# Altium PCB AudioMoth-v1.3.PcbDoc (part 2 of 4)
Units mil, origin at the board's own origin, x right, y up, seen from the top; angles counter-clockwise.
Board outline 4924.42 x 1891.72 mil, 4 copper layers (Top Layer, Layer 1, Layer 2, Bottom Layer), stack 61.651 mil thick; 157 components, 143 nets, 670 pads, 350 vias.
Unrouted connection lines stored in the file: 32.
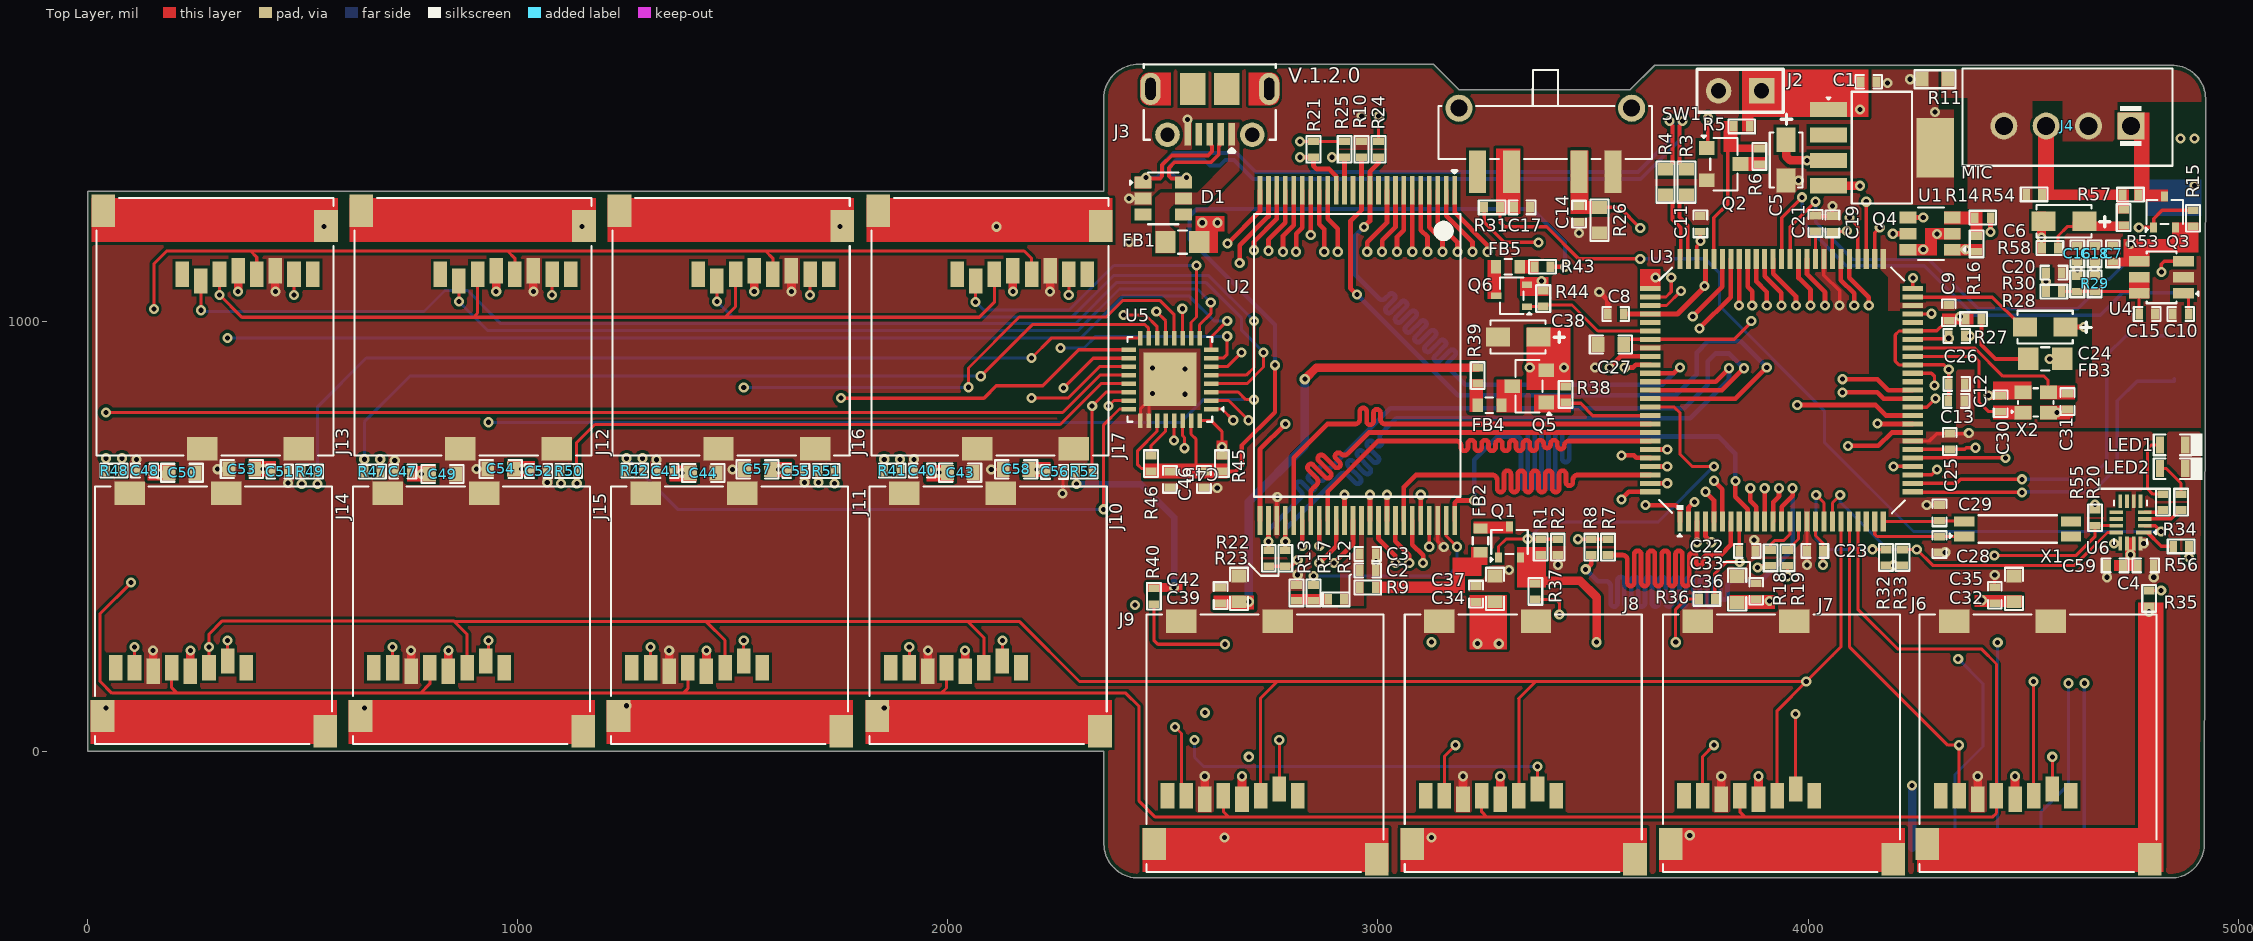
[diagram p0: Top Layer view]

## Part data (continued)
Q4: "MOSFET N/P-CH 20V 3A/2.2A SSOT-6", LCSC Part Number=C154515, Manufacturer="ON Semiconductor / Fairchild", ComponentLink1Description=https://datasheet.ciiva.com/4440/fdc6420c-102817-4440882.pdf?src-supplier=Mouser, ComponentLink1URL=https://datasheet.ciiva.com/4440/fdc6420c-102817-4440882.pdf?src-supplier=Mouser, ComponentLink2Description=https://datasheet.ciiva.com/6039/265059-6039814.pdf?src-supplier=Farnell, ComponentLink2URL=https://datasheet.ciiva.com/6039/265059-6039814.pdf?src-supplier=Farnell, ComponentLink3Description=https://datasheet.ciiva.com/6386/fdc6420c-6386714.pdf?src-supplier=Digikey, ComponentLink3URL=https://datasheet.ciiva.com/6386/fdc6420c-6386714.pdf?src-supplier=Digikey, ComponentLink4Description=https://datasheet.ciiva.com/6386/fdc6420c-6386716.pdf?src-supplier=Digikey, ComponentLink4URL=https://datasheet.ciiva.com/6386/fdc6420c-6386716.pdf?src-supplier=Digikey, ComponentLink5Description=https://datasheet.ciiva.com/8115/fdc6420c-8115576.pdf?src-supplier=Avnet, ComponentLink5URL=https://datasheet.ciiva.com/8115/fdc6420c-8115576.pdf?src-supplier=Avnet, ComponentLink6Description=https://datasheet.ciiva.com/7967/265059-7967846.pdf?src-supplier=Element14, ComponentLink6URL=https://datasheet.ciiva.com/7967/265059-7967846.pdf?src-supplier=Element14, ComponentLink7Description=https://datasheet.ciiva.com/22681/265059-22681865.pdf?src-supplier=Element14, ComponentLink7URL=https://datasheet.ciiva.com/22681/265059-22681865.pdf?src-supplier=Element14, ComponentLink8Description=https://datasheet.ciiva.com/17288/fdc6420c-17288069.pdf?src-supplier=Future+Electronics, ComponentLink8URL=https://datasheet.ciiva.com/17288/fdc6420c-17288069.pdf?src-supplier=Future+Electronics, Item Type=MOSFETs, Manufacturer Part Number=FDC6420C, Pricing="3000=0.21, 6000=0.205, 9000=0.2, 12000=0.2, 15000=0.195 (USD)", RoHS=Yes, Stock=42000, Supplier="Future Electronics"
Q5: "P-Channel MOSFETs ROHS", LCSC Part Number=C7202986, Manufacturer="TECH PUBLIC", Package=SOT-23, ComponentLink1Description=LCSC, ComponentLink1URL=https://www.lcsc.com/product-detail/MOSFETs_TECH-PUBLIC-DMG3415U_C7202986.html, Item Type=MOSFET, Manufacturer Part Number=DMG3415U
R1 R2 R10 R15 R17 R21 R22 R23 R24 R25 R31 R35 R36 R37 R38 R40 R41 R42 R43 R45 R46 R47 R48 R49 R50 R51 R52 R55 R56: library part RC0402FR-0710KL, "RES 10K OHM 1% 1/16W 0402", Case Code (Imperial)=0402, Case Code (Metric)=1005, LCSC Part Number=C60490, Manufacturer=Yageo, Max Operating Temperature=155°C, Max Power Dissipation=63mW, Min Operating Temperature=-55°C, Power Rating=62.5mW, Resistance=10kR, Resistance Tolerance=1%, Resistor Type="Thick Film", Supplier Part Number 1=603-RC0402FR-0710KL, Temperature Coefficient=100ppm/°C, Voltage Rating=50V, Case/Package=0402, Category="Chip SMD Resistors", ComponentLink1Description=https://datasheet.ciiva.com/7660/38568-7660787.pdf?src-supplier=Element14, ComponentLink1URL=https://datasheet.ciiva.com/7660/38568-7660787.pdf?src-supplier=Element14, ComponentLink2Description=https://datasheet.ciiva.com/7849/1686128-7849814.pdf?src-supplier=Element14, ComponentLink2URL=https://datasheet.ciiva.com/7849/1686128-7849814.pdf?src-supplier=Element14, ComponentLink3Description=https://datasheet.ciiva.com/7983/1018594-7983486.pdf?src-supplier=Element14, ComponentLink3URL=https://datasheet.ciiva.com/7983/1018594-7983486.pdf?src-supplier=Element14, ComponentLink4Description=https://datasheet.ciiva.com/22747/1018594-22747512.pdf?src-supplier=Element14, ComponentLink4URL=https://datasheet.ciiva.com/22747/1018594-22747512.pdf?src-supplier=Element14, ComponentLink5Description=https://datasheet.ciiva.com/12667/pyu-rc0402-51-rohs-l-6-r-12667067.pdf?src-supplier=Mouser, ComponentLink5URL=https://datasheet.ciiva.com/12667/pyu-rc0402-51-rohs-l-6-r-12667067.pdf?src-supplier=Mouser, ComponentLink6Description=https://datasheet.ciiva.com/7849/1784430-7849813.pdf?src-supplier=Element14, ComponentLink6URL=https://datasheet.ciiva.com/7849/1784430-7849813.pdf?src-supplier=Element14, ComponentLink7Description=https://datasheet.ciiva.com/7849/1784430-7849815.pdf?src-supplier=Element14, ComponentLink7URL=https://datasheet.ciiva.com/7849/1784430-7849815.pdf?src-supplier=Element14, Construction=Rectangular, Depth=0.5mm, Features="Moisture Resistant", Height=0.32mm, Item Type=Resistor, Lead Free="Lead Free", Lead Pitch=0.2mm, Length=1mm, Manufacturer Part Number=RC0402FR-0710KL, Military Standard=Not, Number of Pins=2, Number of Terminations=2, Packaging="Tape and Reel", Pricing 1="1=0.10000, 10=0.01400, 50=0.01400, 100=0.00500, 1000=0.00300, 10000=0.00200 (USD)", REACH SVHC="No SVHC", RoHS=Yes, RoHS Compliant=Yes, Series=RC, Stock 1=18648329, Supplier 1=Mouser, Termination=SMD/SMT, Tolerance=1%, Voltage Rating (DC)=50V, Width=0.5mm, Working Voltage=50V
R3 R4: library part RC0603FR-0715RL, "RES 15 OHM 1% 1/10W 0603", Current Rating=50mA, LCSC Part Number=C128059, Manufacturer=Yageo, Supplier Part Number=6308514, Voltage Rating (AC)=50V, Category="Chip SMD Resistors", ComponentLink1Description=https://datasheet.ciiva.com/5989/1686128-5989704.pdf?src-supplier=Farnell, ComponentLink1URL=https://datasheet.ciiva.com/5989/1686128-5989704.pdf?src-supplier=Farnell, ComponentLink2Description=https://datasheet.ciiva.com/8890/pyu-rc0603-51-rohs-l-4-8890742.pdf?src-supplier=Avnet, ComponentLink2URL=https://datasheet.ciiva.com/8890/pyu-rc0603-51-rohs-l-4-8890742.pdf?src-supplier=Avnet, ComponentLink3Description=https://datasheet.ciiva.com/12557/rc0603-272842-12557839.pdf?src-supplier=Mouser, ComponentLink3URL=https://datasheet.ciiva.com/12557/rc0603-272842-12557839.pdf?src-supplier=Mouser, ComponentLink4Description=https://datasheet.ciiva.com/2454/pyu-r-int-thick-7-2454840.pdf?src-supplier=Digikey, ComponentLink4URL=https://datasheet.ciiva.com/2454/pyu-r-int-thick-7-2454840.pdf?src-supplier=Digikey, ComponentLink5Description=https://datasheet.ciiva.com/2454/pyu-r-int-thick-7-2454841.pdf?src-supplier=Digikey, ComponentLink5URL=https://datasheet.ciiva.com/2454/pyu-r-int-thick-7-2454841.pdf?src-supplier=Digikey, ComponentLink6Description=https://datasheet.ciiva.com/2454/pyu-r-int-thick-7-2454842.pdf?src-supplier=Digikey, ComponentLink6URL=https://datasheet.ciiva.com/2454/pyu-r-int-thick-7-2454842.pdf?src-supplier=Digikey, ComponentLink7Description=https://datasheet.ciiva.com/7746/443971-7746262.pdf?src-supplier=Element14, ComponentLink7URL=https://datasheet.ciiva.com/7746/443971-7746262.pdf?src-supplier=Element14, ComponentLink8Description=https://datasheet.ciiva.com/7746/443971-7746263.pdf?src-supplier=Element14, ComponentLink8URL=https://datasheet.ciiva.com/7746/443971-7746263.pdf?src-supplier=Element14, Contact Material=157ConductorMaterial, Item Type=Resistor, Lead Free=5697LeadFree, Manufacturer Part Number=RC0603FR-0715RL, Pricing="5000=0.0011, 75000=0.001, 200000=0.001, 500000=0.001, 1250000=0.0009 (USD)", RoHS=Yes, Stock=5830000, Supplier="Future Electronics", Weight=250mg
R5 R6: library part RC0402FR-0749K9L, "RES 49.9K OHM 1% 1/16W 0402", Case Code (Imperial)=0402, Case Code (Metric)=1005, LCSC Part Number=C137969, Manufacturer=Yageo, Max Operating Temperature=155°C, Max Power Dissipation=63mW, Min Operating Temperature=-55°C, Power Rating=62.5mW, Supplier Part Number=311-49.9KLRCT-ND, Temperature Coefficient=100ppm/°C, Tolerance=1%, Voltage Rating=50V, Case/Package=0402, Category="Chip SMD Resistors", ComponentLink1Description=https://datasheet.ciiva.com/17071/pyu-rc0402-51-rohs-l-6-r-17071066.pdf?src-supplier=Future+Electronics, ComponentLink1URL=https://datasheet.ciiva.com/17071/pyu-rc0402-51-rohs-l-6-r-17071066.pdf?src-supplier=Future+Electronics, Construction=Rectangular, Depth=0.5mm, Features="Moisture Resistant", Item Type=Resistor, Lead Free="Lead Free", Length=1mm, Manufacturer Part Number=RC0402FR-0749K9L, Military Standard=Not, Number of Terminations=2, Packaging="Tape and Reel", Pricing="1=0.1, 10=0.015, 50=0.0088, 100=0.0073, 500=0.00488, 1000=0.00417, 5000=0.00297 (USD)", RoHS=Yes, RoHS Compliant=Yes, Series=RC, Stock=5084418, Supplier=Digikey, Termination=SMD/SMT, Voltage Rating (DC)=50V
R7 R12: library part RC0402FR-070RL, "RES 0 OHM JUMPER 1/16W 0402", Case Code (Imperial)=0402, Case Code (Metric)=1005, LCSC Part Number=C106231, Manufacturer=Yageo, Max Operating Temperature=155°C, Max Power Dissipation=63mW, Min Operating Temperature=-55°C, Power Rating=62.5mW, Resistance=0R, Resistor Type="Thick Film", Supplier Part Number 1=603-RC0402FR-070RL, Temperature Coefficient=200ppm/°C, Tolerance=1%, Voltage Rating=50V, Case/Package=0402, ComponentLink1Description=https://datasheet.ciiva.com/8896/pyu-rc0402-51-rohs-l-6-8896149.pdf?src-supplier=Avnet, ComponentLink1URL=https://datasheet.ciiva.com/8896/pyu-rc0402-51-rohs-l-6-8896149.pdf?src-supplier=Avnet, ComponentLink2Description=https://datasheet.ciiva.com/16790/pyu-rc0402-51-rohs-l-6-r-16790444.pdf?src-supplier=Future+Electronics, ComponentLink2URL=https://datasheet.ciiva.com/16790/pyu-rc0402-51-rohs-l-6-r-16790444.pdf?src-supplier=Future+Electronics, Contact Plating=Tin,Matte, Features="Moisture Resistant", Height=0.35mm, Item Type=Resistors, Lead Free="Lead Free", Length=1mm, Manufacturer Part Number=RC0402FR-070RL, Mount="Surface Mount", Number of Terminations=2, Packaging="Tape and Reel", Pricing 1="1=0.10000, 10=0.01400, 50=0.01400, 100=0.00600, 1000=0.00300, 5000=0.00200, 10000=0.00100 (USD)", Radiation Hardening=No, RoHS=Yes, RoHS Compliant=Yes, Series=RC, Size Code=0402, Stock 1=8556842, Supplier 1=Mouser, Termination=SMD/SMT, Width=0.5mm
R8 R13 R18 R19 R53: library part RC0402FR-070RL, "RES 0 OHM JUMPER 1/16W 0402", Case Code (Imperial)=0402, Case Code (Metric)=1005, LCSC Part Number=C106231, Manufacturer=Yageo, Max Operating Temperature=155°C, Max Power Dissipation=63mW, Min Operating Temperature=-55°C, Power Rating=62.5mW, Resistor Type="Thick Film", Supplier Part Number 1=603-RC0402FR-070RL, Temperature Coefficient=200ppm/°C, Tolerance=1%, Voltage Rating=50V, Case/Package=0402, ComponentLink1Description=https://datasheet.ciiva.com/8896/pyu-rc0402-51-rohs-l-6-8896149.pdf?src-supplier=Avnet, ComponentLink1URL=https://datasheet.ciiva.com/8896/pyu-rc0402-51-rohs-l-6-8896149.pdf?src-supplier=Avnet, ComponentLink2Description=https://datasheet.ciiva.com/16790/pyu-rc0402-51-rohs-l-6-r-16790444.pdf?src-supplier=Future+Electronics, ComponentLink2URL=https://datasheet.ciiva.com/16790/pyu-rc0402-51-rohs-l-6-r-16790444.pdf?src-supplier=Future+Electronics, Contact Plating=Tin,Matte, Features="Moisture Resistant", Height=0.35mm, Item Type=Resistors, Lead Free="Lead Free", Length=1mm, Manufacturer Part Number=RC0402FR-070RL, Mount="Surface Mount", Number of Terminations=2, Packaging="Tape and Reel", Pricing 1="1=0.10000, 10=0.01400, 50=0.01400, 100=0.00600, 1000=0.00300, 5000=0.00200, 10000=0.00100 (USD)", Radiation Hardening=No, Resistance=0R, RoHS=Yes, RoHS Compliant=Yes, Series=RC, Size Code=0402, Stock 1=8556842, Supplier 1=Mouser, Termination=SMD/SMT, Width=0.5mm
R9 R27 R28 R29 R30 R39 R44: library part RC0402FR-071RL, "RES 1 OHM 1% 1/16W 0402", Case Code (Imperial)=0402, Case Code (Metric)=1005, LCSC Part Number=C185446, Manufacturer=Yageo, Max Operating Temperature=155°C, Max Power Dissipation=63mW, Min Operating Temperature=-55°C, Power Rating=62.5mW, Resistance Tolerance=1%, Resistor Type="Thick Film", Supplier Part Number 1=603-RC0402FR-071RL, Temperature Coefficient=200ppm/°C, Voltage Rating=50V, Case/Package=0402, Category="Chip SMD Resistors", ComponentLink1Description=https://datasheet.ciiva.com/11808/0900766b80c66297-11808794.pdf?src-supplier=RSComponents, ComponentLink1URL=https://datasheet.ciiva.com/11808/0900766b80c66297-11808794.pdf?src-supplier=RSComponents, ComponentLink2Description=https://datasheet.ciiva.com/7849/1018594-7849895.pdf?src-supplier=Element14, ComponentLink2URL=https://datasheet.ciiva.com/7849/1018594-7849895.pdf?src-supplier=Element14, ComponentLink3Description=https://datasheet.ciiva.com/7849/1018594-7849894.pdf?src-supplier=Element14, ComponentLink3URL=https://datasheet.ciiva.com/7849/1018594-7849894.pdf?src-supplier=Element14, ComponentLink4Description=https://datasheet.ciiva.com/46394/1018594-46394952.pdf?src-supplier=Element14, ComponentLink4URL=https://datasheet.ciiva.com/46394/1018594-46394952.pdf?src-supplier=Element14, ComponentLink5Description=https://datasheet.ciiva.com/12667/pyu-rc0402-51-rohs-l-6-r-12667915.pdf?src-supplier=Mouser, ComponentLink5URL=https://datasheet.ciiva.com/12667/pyu-rc0402-51-rohs-l-6-r-12667915.pdf?src-supplier=Mouser, ComponentLink6Description=https://datasheet.ciiva.com/16740/pyu-rc0402-51-rohs-l-6-r-16740903.pdf?src-supplier=Future+Electronics, ComponentLink6URL=https://datasheet.ciiva.com/16740/pyu-rc0402-51-rohs-l-6-r-16740903.pdf?src-supplier=Future+Electronics, Construction=Rectangular, Depth=0.5mm, Features="Moisture Resistant", Height=0.32mm, Item Type=Resistor, Lead Free="Lead Free", Length=1mm, Manufacturer Part Number=RC0402FR-071RL, Military Standard=Not, Number of Terminations=2, Packaging="Tape and Reel", Pricing 1="1=0.10000, 10=0.02200, 50=0.02200, 100=0.00900, 1000=0.00400, 10000=0.00200 (USD)", REACH SVHC="No SVHC", Resistance=1R, RoHS=Yes, RoHS Compliant=Yes, Series=RC, Stock 1=239284, Supplier 1=Mouser, Technology="THICK FILM", Termination=SMD/SMT, Tolerance=1%, Voltage Rating (DC)=50V, Working Voltage=50V
R11: library part RC0603JR-070RL, "RES 0 OHM JUMPER 1/10W 0603", Case Code (Imperial)=0603, Case Code (Metric)=1608, LCSC Part Number=C95177, Manufacturer=Yageo, Max Operating Temperature=155°C, Max Power Dissipation=100mW, Min Operating Temperature=-55°C, Package Quantity=5000, Resistance=0mR, Resistance Tolerance=5%, Resistor Type="Thick Film", Supplier Part Number 1=311-0.0GRCT-ND, Temperature Coefficient=200ppm/°C, Tolerance=1%, Voltage Rating=50V, Case/Package=0603, Category="Chip SMD Resistors", Construction=Rectangular, Contact Plating=Tin,Matte, Depth=0.8mm, Features="Moisture Resistant", Height=0.45mm, Item Type=Resistor, Lead Free="Lead Free", Length=1.6mm, Manufacturer Part Number=RC0603JR-070RL, Military Standard=Not, Number of Pins=2, Number of Terminations=2, Packaging="Tape and Reel", Power Rating=100mW, Pricing 1="1=0.10000, 10=0.01700, 25=0.01240, 50=0.00960, 100=0.00700, 250=0.00536, 500=0.00430, 1000=0.00316 (USD)", Radiation Hardening=No, Reach SVHC Compliant="No SVHC", RoHS=Yes, RoHS Compliant=Yes, Series=RC, Size Code=0603, Stock 1=18081776, Supplier 1=Digi-Key, Technology="THICK FILM", Termination=SMD/SMT, Voltage Rating (DC)=50V, Width=0.8mm
R14: library part RC0402FR-076K8L, "RES 6.8K OHM 1% 1/16W 0402", Case Code (Imperial)=0402, Case Code (Metric)=1005, LCSC Part Number=C93940, Manufacturer=Yageo, Max Operating Temperature=155°C, Max Power Dissipation=63mW, Min Operating Temperature=-55°C, Package Quantity=1, Resistance=6.8kR, Resistance Tolerance=1%, Resistor Type="Thick Film", Temperature Coefficient=100ppm/°C, Voltage Rating=50V, Case/Package=0402, Category="Chip SMD Resistors", ComponentLink1Description=https://datasheet.ciiva.com/11819/0900766b80c66297-11819535.pdf?src-supplier=RSComponents, ComponentLink1URL=https://datasheet.ciiva.com/11819/0900766b80c66297-11819535.pdf?src-supplier=RSComponents, ComponentLink2Description=https://datasheet.ciiva.com/2453/pyu-r-int-thick-7-2453500.pdf?src-supplier=Digi-Key, ComponentLink2URL=https://datasheet.ciiva.com/2453/pyu-r-int-thick-7-2453500.pdf?src-supplier=Digi-Key, ComponentLink3Description=https://datasheet.ciiva.com/2453/pyu-r-int-thick-7-2453501.pdf?src-supplier=Digi-Key, ComponentLink3URL=https://datasheet.ciiva.com/2453/pyu-r-int-thick-7-2453501.pdf?src-supplier=Digi-Key, ComponentLink4Description=https://datasheet.ciiva.com/2453/pyu-r-int-thick-7-2453499.pdf?src-supplier=Digi-Key, ComponentLink4URL=https://datasheet.ciiva.com/2453/pyu-r-int-thick-7-2453499.pdf?src-supplier=Digi-Key, ComponentLink5Description=https://datasheet.ciiva.com/12668/pyu-rc0402-51-rohs-l-6-r-12668201.pdf?src-supplier=Mouser, ComponentLink5URL=https://datasheet.ciiva.com/12668/pyu-rc0402-51-rohs-l-6-r-12668201.pdf?src-supplier=Mouser, ComponentLink6Description=https://datasheet.ciiva.com/7850/1018594-7850078.pdf?src-supplier=Element14, ComponentLink6URL=https://datasheet.ciiva.com/7850/1018594-7850078.pdf?src-supplier=Element14, ComponentLink7Description=https://datasheet.ciiva.com/7850/1018594-7850079.pdf?src-supplier=Element14, ComponentLink7URL=https://datasheet.ciiva.com/7850/1018594-7850079.pdf?src-supplier=Element14, ComponentLink8Description=https://datasheet.ciiva.com/16741/pyu-rc0402-51-rohs-l-6-r-16741018.pdf?src-supplier=Future+Electronics, ComponentLink8URL=https://datasheet.ciiva.com/16741/pyu-rc0402-51-rohs-l-6-r-16741018.pdf?src-supplier=Future+Electronics, Construction=Rectangular, Depth=0.5mm, Features="Moisture Resistant", Height=0.016inch, Item Type=Resistor, Lead Free="Lead Free", Length=0.039inch, Manufacturer Part Number=RC0402FR-076K8L, Military Standard=Not, Number of Pins=2, Number of Terminations=2, Packaging="Tape and Reel", Power Rating=63mW, Pricing 1="10000=0.00085 (USD)", Reach SVHC Compliant=Yes, RoHS=Yes, RoHS Compliant=Yes, Series=RC, Size Code=0402, Stock 1=290000, Supplier 1=Avnet, Supplier Part Number 1=RC0402FR-076K8L, Technology="THICK FILM", Termination=SMD/SMT, Tolerance=1%, Voltage Rating (DC)=50V, Width=0.02inch
R16 R32 R33: library part RC0402FR-074K7L, "RES 4.7K OHM 1% 1/16W 0402", Case Code (Imperial)=0402, Case Code (Metric)=1005, LCSC Part Number=C105871, Manufacturer=Yageo, Max Operating Temperature=155°C, Max Power Dissipation=63mW, Min Operating Temperature=-55°C, Power Rating=62.5mW, Resistance=4.7kR, Resistance Tolerance=1%, Resistor Type="Thick Film", Temperature Coefficient=100ppm/°C, Voltage Rating=50V, Case/Package=0402, Category="Chip SMD Resistors", ComponentLink1Description=https://datasheet.ciiva.com/22661/1686128-22661342.pdf?src-supplier=Element14, ComponentLink1URL=https://datasheet.ciiva.com/22661/1686128-22661342.pdf?src-supplier=Element14, ComponentLink2Description=https://datasheet.ciiva.com/7850/1018594-7850022.pdf?src-supplier=Element14, ComponentLink2URL=https://datasheet.ciiva.com/7850/1018594-7850022.pdf?src-supplier=Element14, ComponentLink3Description=https://datasheet.ciiva.com/7850/1018594-7850023.pdf?src-supplier=Element14, ComponentLink3URL=https://datasheet.ciiva.com/7850/1018594-7850023.pdf?src-supplier=Element14, ComponentLink4Description=https://datasheet.ciiva.com/15215/getdatasheetpartid-328119-15215035.pdf?src-supplier=Verical, ComponentLink4URL=https://datasheet.ciiva.com/15215/getdatasheetpartid-328119-15215035.pdf?src-supplier=Verical, Construction=Rectangular, Depth=0.5mm, Features="Moisture Resistant", Height=0.32mm, Height - Seated (Max)=0.016inch, Item Type=Resistor, Lead Free="Lead Free", Length=1mm, Manufacturer Part Number=RC0402FR-074K7L, Military Standard=Not, Number of Pins=2, Number of Terminations=2, Packaging="Tape and Reel", Pricing 1="10000=0.00085 (USD)", Reach SVHC Compliant=Yes, RoHS=Yes, RoHS Compliant=Yes, Series=RC, Size Code=0402, Stock 1=2420000, Supplier 1=Avnet, Supplier Part Number 1=RC0402FR-074K7L, Termination=SMD/SMT, Tolerance=1%, Voltage Rating (DC)=50V, Width=0.5mm
R20: library part RC0402FR-07240RL, "RES 240 OHM 1% 1/16W 0402", Case Code (Imperial)=0402, Case Code (Metric)=1005, LCSC Part Number=C114755, Manufacturer=Yageo, Max Operating Temperature=155°C, Max Power Dissipation=63mW, Min Operating Temperature=-55°C, Package Quantity=1, Resistance Tolerance=1%, Resistor Type="Thick Film", Supplier Part Number 1=603-RC0402FR-07240RL, Temperature Coefficient=100ppm/°C, Voltage Rating=50V, Case/Package=0402, ComponentLink1Description=https://datasheet.ciiva.com/7849/1018594-7849915.pdf?src-supplier=Element14, ComponentLink1URL=https://datasheet.ciiva.com/7849/1018594-7849915.pdf?src-supplier=Element14, ComponentLink2Description=https://datasheet.ciiva.com/7849/1018594-7849916.pdf?src-supplier=Element14, ComponentLink2URL=https://datasheet.ciiva.com/7849/1018594-7849916.pdf?src-supplier=Element14, ComponentLink3Description=https://datasheet.ciiva.com/2519/pyu-r-int-thick-7-2519157.pdf?src-supplier=Digi-Key, ComponentLink3URL=https://datasheet.ciiva.com/2519/pyu-r-int-thick-7-2519157.pdf?src-supplier=Digi-Key, ComponentLink4Description=https://datasheet.ciiva.com/2519/pyu-r-int-thick-7-2519158.pdf?src-supplier=Digi-Key, ComponentLink4URL=https://datasheet.ciiva.com/2519/pyu-r-int-thick-7-2519158.pdf?src-supplier=Digi-Key, ComponentLink5Description=https://datasheet.ciiva.com/2519/pyu-r-int-thick-7-2519156.pdf?src-supplier=Digi-Key, ComponentLink5URL=https://datasheet.ciiva.com/2519/pyu-r-int-thick-7-2519156.pdf?src-supplier=Digi-Key, ComponentLink6Description=https://datasheet.ciiva.com/12669/pyu-rc0402-51-rohs-l-6-r-12669689.pdf?src-supplier=Mouser, ComponentLink6URL=https://datasheet.ciiva.com/12669/pyu-rc0402-51-rohs-l-6-r-12669689.pdf?src-supplier=Mouser, ComponentLink7Description=https://datasheet.ciiva.com/17419/pyu-rc0402-51-rohs-l-6-r-17419482.pdf?src-supplier=Future+Electronics, ComponentLink7URL=https://datasheet.ciiva.com/17419/pyu-rc0402-51-rohs-l-6-r-17419482.pdf?src-supplier=Future+Electronics, Construction=Rectangular, Depth=0.5mm, Features="Moisture Resistant", Height=0.016inch, Item Type=Resistors, Lead Free="Lead Free", Length=1mm, Manufacturer Part Number=RC0402FR-07240RL, Military Standard=Not, Number of Terminations=2, Packaging="Tape and Reel", Power Rating=63mW, Pricing 1="1=0.10000, 10=0.01200, 50=0.01200, 100=0.00500, 1000=0.00300, 10000=0.00100 (USD)", REACH SVHC=Unknown, Resistance=240R, RoHS=Yes, RoHS Compliant=Yes, Series=RC, Size Code=0402, Stock 1=1903202, Supplier 1=Mouser, Termination=SMD/SMT, Tolerance=1%, Voltage Rating (DC)=50V, Width=0.02inch
R26: library part RC0603JR-07270KL, "RES 270K OHM 5% 1/10W 0603", Case Code (Imperial)=0603, Case Code (Metric)=1608, LCSC Part Number=C137642, Manufacturer=Yageo, Max Operating Temperature=155°C, Max Power Dissipation=100mW, Min Operating Temperature=-55°C, Resistance=270kR, Resistance Tolerance=5%, Resistor Type="Thick Film", Temperature Coefficient=100ppm/°C, Voltage Rating=50V, Working Voltage=75V, Case/Package=0603, Category="Chip SMD Resistors", ComponentLink1Description=https://datasheet.ciiva.com/22643/1868787-22643417.pdf?src-supplier=Element14, ComponentLink1URL=https://datasheet.ciiva.com/22643/1868787-22643417.pdf?src-supplier=Element14, ComponentLink2Description=https://datasheet.ciiva.com/12558/rc0603-272842-12558662.pdf?src-supplier=Mouser, ComponentLink2URL=https://datasheet.ciiva.com/12558/rc0603-272842-12558662.pdf?src-supplier=Mouser, ComponentLink3Description=https://datasheet.ciiva.com/7746/443971-7746474.pdf?src-supplier=Element14, ComponentLink3URL=https://datasheet.ciiva.com/7746/443971-7746474.pdf?src-supplier=Element14, ComponentLink4Description=https://datasheet.ciiva.com/7746/443971-7746473.pdf?src-supplier=Element14, ComponentLink4URL=https://datasheet.ciiva.com/7746/443971-7746473.pdf?src-supplier=Element14, Construction=Rectangular, Depth=0.8mm, Features="Moisture Resistant", Height=0.45mm, Lead Free="Lead Free", Length=1.6mm, Manufacturer Part Number=RC0603JR-07270KL, Military Standard=Not, Number of Pins=2, Number of Terminations=2, Packaging="Tape and Reel", Power Rating=100mW, Pricing 1="1=0.04100, 10=0.00590, 100=0.00230 (USD)", REACH SVHC="No SVHC", RoHS=Yes, RoHS Compliant=Yes, Series=RC, Stock 1=910, Supplier 1="Arrow Electronics", Supplier Part Number 1=RC0603JR-07270KL, Termination=SMD/SMT, Tolerance=5%, Voltage Rating (DC)=50V, Width=0.8mm
R34: library part RC0402FR-07133RL, "RES 133 OHM 1% 1/16W 0402", Case Code (Imperial)=0402, Case Code (Metric)=1005, LCSC Part Number=C327373, Manufacturer=Yageo, Max Operating Temperature=155°C, Max Power Dissipation=63mW, Min Operating Temperature=-55°C, Power Rating=62.5mW, Resistor Type="Thick Film", Supplier Part Number 1=603-RC0402FR-07133RL, Temperature Coefficient=100ppm/°C, Tolerance=1%, Voltage Rating=50V, Case/Package=0402, Category="Chip SMD Resistors", ComponentLink1Description=https://datasheet.ciiva.com/8887/pyu-rc0402-51-rohs-l-6-8887451.pdf?src-supplier=Avnet, ComponentLink1URL=https://datasheet.ciiva.com/8887/pyu-rc0402-51-rohs-l-6-8887451.pdf?src-supplier=Avnet, Construction=Rectangular, Contact Plating=Tin,Matte, Depth=0.5mm, Features="Moisture Resistant", Height=0.016inch, Lead Free="Lead Free", Length=1mm, Manufacturer Part Number=RC0402FR-07133RL, Military Standard=Not, Number of Terminations=2, Packaging="Tape and Reel", Pricing 1="1=0.10000, 10=0.01200, 50=0.01200, 100=0.00500, 1000=0.00300, 2500=0.00200, 10000=0.00100 (USD)", Resistance=133R, RoHS=Yes, RoHS Compliant=Yes, Series=RC, Size Code=0402, Stock 1=12475, Supplier 1=Mouser, Termination=SMD/SMT, Width=0.02inch
R54 R57 R58: library part RC0402JR-0710ML, "RES SMD 10M Ohm 5% 1/16W 0402", Case Code (Imperial)=0402, Case Code (Metric)=1005, LCSC Part Number=C274900, Manufacturer=Yageo, Max Operating Temperature=155°C, Max Power Dissipation=63mW, Min Operating Temperature=-55°C, Package Quantity=1, Power Rating=62.5mW, Resistance=10MR, Resistance Tolerance=5%, Resistor Type="Thick Film", Supplier Part Number 1=311-10MJRCT-ND, Temperature Coefficient=100ppm/°C, Voltage Rating=50V, Case/Package=0402, Category="Chip SMD Resistors", ComponentLink1Description=https://datasheet.ciiva.com/7983/1018594-7983541.pdf?src-supplier=Element14, ComponentLink1URL=https://datasheet.ciiva.com/7983/1018594-7983541.pdf?src-supplier=Element14, ComponentLink2Description=https://datasheet.ciiva.com/2518/pyu-r-int-thick-7-2518904.pdf?src-supplier=Digi-Key, ComponentLink2URL=https://datasheet.ciiva.com/2518/pyu-r-int-thick-7-2518904.pdf?src-supplier=Digi-Key, ComponentLink3Description=https://datasheet.ciiva.com/2518/pyu-r-int-thick-7-2518905.pdf?src-supplier=Digi-Key, ComponentLink3URL=https://datasheet.ciiva.com/2518/pyu-r-int-thick-7-2518905.pdf?src-supplier=Digi-Key, ComponentLink4Description=https://datasheet.ciiva.com/2518/pyu-r-int-thick-7-2518906.pdf?src-supplier=Digi-Key, ComponentLink4URL=https://datasheet.ciiva.com/2518/pyu-r-int-thick-7-2518906.pdf?src-supplier=Digi-Key, ComponentLink5Description=https://datasheet.ciiva.com/12577/pyu-rc0402-51-rohs-l-6-r-12577774.pdf?src-supplier=Mouser, ComponentLink5URL=https://datasheet.ciiva.com/12577/pyu-rc0402-51-rohs-l-6-r-12577774.pdf?src-supplier=Mouser, Construction=Rectangular, Depth=0.5mm, Features="Moisture Resistant", Height=0.016inch, Lead Free="Lead Free", Length=1mm, Manufacturer Part Number=RC0402JR-0710ML, Military Standard=Not, Number of Pins=2, Number of Terminations=2, Packaging="Tape and Reel", Pricing 1="1=0.10000, 10=0.01300, 100=0.00540, 1000=0.00244, 2500=0.00212, 5000=0.00175 (USD)", REACH SVHC="No SVHC", RoHS=Yes, RoHS Compliant=Yes, Series=RC, Size Code=0402, Stock 1=38636, Supplier 1=Digi-Key, Termination=SMD/SMT, Tolerance=5%, Voltage Rating (DC)=50V, Weight=2.3E-05oz, Width=0.02inch
SW1: "300mA Horizontal attachment triple-pole/single-throw 4V 10,000 times SMD Slide Switches ROHS / Switch Slide SP3T Side Slide 0.3A 4VDC 10000Cycle Gull Wing SMD T/R", Case/Package=SMD/SMT, Contact Current Rating=300mA, Contact Resistance=70mR, LCSC Part Number=C160877, Manufacturer="Alps Electric", Max Operating Temperature=85°C, Max Voltage Rating (DC)=4V, Min Operating Temperature=-10°C, ComponentLink1Description=https://datasheet.ciiva.com/16174/793ssss7-16174698.pdf?src-supplier=Onlinecomponents.com, ComponentLink1URL=https://datasheet.ciiva.com/16174/793ssss7-16174698.pdf?src-supplier=Onlinecomponents.com, Electrical Life=10000Cycles, Item Type="Slide Switches", Manufacturer Part Number=SSSS711403, Mechanical Life=10000Cycles, Mounting Technology="Surface Mount", Orientation="Right Angle", Packaging="Tape and Reel", Pricing="2000=0.72384, 4000=0.7072, 8000=0.69056, 12000=0.67392, 16000=0.65728, 20000=0.64064, 200000=0.63232 (USD)", Radiation Hardening=No, RoHS=Yes, RoHS Compliant=Yes, Stock=16000, Supplier=Avnet, Termination=Solder, Throw Configuration=SP3T, Voltage Rating (AC)=4V
U1: "IC REG LINEAR 3.3V 1A SOT223-5", Case/Package=TO-261-5, Dropout Voltage=650mV, Manufacturer="TI National Semiconductor", Max Operating Temperature=125°C, Max Supply Current=100uA, Max Supply Voltage=10V, Min Operating Temperature=-40°C, Min Output Voltage=3.3V, Output Current=1A, Power Supply Rejection Ratio (PSRR)=55dB, Quiescent Current=55uA, Supplier Part Number=926-LP38692MPX33NOPB, ComponentLink1Description=https://datasheet.ciiva.com/6583/lp38690-6583575.pdf?src-supplier=Digikey, ComponentLink1URL=https://datasheet.ciiva.com/6583/lp38690-6583575.pdf?src-supplier=Digikey, Item Type=IC, Lead Free="Lead Free", Manufacturer Part Number=LP38692MPX-3.3/NOPB, Mounting Technology="Surface Mount", Number of Regulators=1, Output Configuration=Positive, Output Type=Fixed, Output Voltage=3.3V, Packaging="Cut Tape", Pins=5, Pricing="1=1.46, 10=1.12, 50=1.12, 100=0.99, 1000=0.795, 10000=0.736 (USD)", RoHS=Yes, RoHS Compliant=Yes, Series=-, Stock=1537, Supplier=Mouser
U2: "IC SRAM 16MBIT PARALLEL 48TSOP I", Case/Package=TFSOP, Manufacturer=ISSI, Max Operating Temperature=85°C, Min Operating Temperature=-40°C, Supplier Part Number=706-IS62WV102416DBLL-55TLI-TRCT-ND, Access Time=55ns, ComponentLink1Description=http://www.mouser.com/ds/2/198/62-65WV102416DALL-DBLL-319010.pdf?src-supplier=Mouser, ComponentLink1URL=http://www.mouser.com/ds/2/198/62-65WV102416DALL-DBLL-319010.pdf?src-supplier=Mouser, ComponentLink2Description=http://www.issi.com/WW/pdf/62-65WV102416DALL-DBLL.pdf?src-supplier=Avnet, ComponentLink2URL=http://www.issi.com/WW/pdf/62-65WV102416DALL-DBLL.pdf?src-supplier=Avnet, ComponentLink3Description=http://www.issi.com/WW/pdf/62-65WV102416DALL-DBLL.pdf?src-supplier=Digikey, ComponentLink3URL=http://www.issi.com/WW/pdf/62-65WV102416DALL-DBLL.pdf?src-supplier=Digikey, Item Type=IC, Manufacturer Part Number=IS62WV102416DBLL-55TLI-TR, Memory Format=Volatile,SRAM, Memory Size=16Mb, Mounting Technology="Surface Mount", Packaging="Tape and Reel", Pricing="1=11.11, 10=9.865, 25=9.408, 50=9.0762, 100=8.7557, 250=8.34852, 500=8.05256 (USD)", RoHS=Yes, RoHS Compliant=Yes, Series=-, Stock=1390, Supplier=Digikey
U3: "IC MCU 32BIT 256KB FLASH 100LQFP", Manufacturer="Silicon Labs", Supplier Part Number=634-WG380256BQFP100R, Item Type=IC, Manufacturer Part Number=EFM32WG380F256-B-QFP100R, Pricing="1=13.12, 10=12.06, 50=11.56, 100=10.18, 1000=8.31, 10000=8.31 (USD)", Stock=2000, Supplier=Mouser
U4: "IC VREF SERIES 0.08% SOT23-6", Case/Package=942Case, LCSC Part Number=C143531, Manufacturer="Analog Devices", Max Operating Temperature=125°C, Max Output current=10mA, Max Supply Voltage=5.5V, Min Input Voltage=2.7V, Min Operating Temperature=-40°C, Min Output Voltage=2.5V, Operating Supply Current=300uA, Quiescent Current=235uA, Tolerance=0.08%, ComponentLink1Description=https://datasheet.octopart.com/MAX6070BAUT25%2BT-Analog-Devices-datasheet-134530559.pdf?src-supplier=LKR, ComponentLink1URL=https://datasheet.octopart.com/MAX6070BAUT25%2BT-Analog-Devices-datasheet-134530559.pdf?src-supplier=LKR, Item Type=IC, Manufacturer Part Number=MAX6070BAUT25+T, Mounting Technology=8Mount, Number of Channels=1NUMBER, Output Current=10mA, Output Type=6317OutputType, Output Voltage=2.5V, Pins=6NUMBER, Pricing="1=3.56, 10=2.63, 50=2.63, 100=2.19, 1000=1.72, 10000=1.53 (USD)", Radiation Hardening=5898YesNo, Reference Type=6142ReferenceType, RoHS=No, Stock=5392, Supplier=Mouser
U5: "IC XPNDR 400KHZ I2C SMBUS 32UQFN", Case/Package=QFN, Clock Frequency=400kHz, LCSC Part Number=C80692, Manufacturer="Texas Instruments", Max Operating Temperature=85°C, Max Supply Voltage=5.5V, Min Operating Temperature=-40°C, Min Supply Voltage=1.65V, Output Current=25mA, Supplier Part Number=595-TCA6424ARGJR, Category="Interface ICs", ComponentLink1Description=https://datasheet.ciiva.com/1600/tca6424a-1600866.pdf?src-supplier=Newark, ComponentLink1URL=https://datasheet.ciiva.com/1600/tca6424a-1600866.pdf?src-supplier=Newark, ComponentLink2Description=https://datasheet.ciiva.com/1496/1535173-1496151.pdf?src-supplier=Element14, ComponentLink2URL=https://datasheet.ciiva.com/1496/1535173-1496151.pdf?src-supplier=Element14, ComponentLink3Description=https://datasheet.ciiva.com/22652/1699435-22652096.pdf?src-supplier=Element14, ComponentLink3URL=https://datasheet.ciiva.com/22652/1699435-22652096.pdf?src-supplier=Element14, ComponentLink4Description=https://datasheet.ciiva.com/1780/tca6424a-1780437.pdf?src-supplier=Digikey, ComponentLink4URL=https://datasheet.ciiva.com/1780/tca6424a-1780437.pdf?src-supplier=Digikey, ComponentLink5Description=https://datasheet.ciiva.com/4826/scps193b-101393-4826180.pdf?src-supplier=Mouser, ComponentLink5URL=https://datasheet.ciiva.com/4826/scps193b-101393-4826180.pdf?src-supplier=Mouser, ComponentLink6Description=https://datasheet.ciiva.com/15134/getdatasheetpartid-254651-15134577.pdf?src-supplier=Verical, ComponentLink6URL=https://datasheet.ciiva.com/15134/getdatasheetpartid-254651-15134577.pdf?src-supplier=Verical, ComponentLink7Description=https://datasheet.ciiva.com/1505/1535173-1505147.pdf?src-supplier=Farnell, ComponentLink7URL=https://datasheet.ciiva.com/1505/1535173-1505147.pdf?src-supplier=Farnell, ComponentLink8Description=https://datasheet.ciiva.com/1780/tca6424a-1780438.pdf?src-supplier=Digikey, ComponentLink8URL=https://datasheet.ciiva.com/1780/tca6424a-1780438.pdf?src-supplier=Digikey, ComponentLink9Description=https://datasheet.ciiva.com/1780/tca6424a-1780439.pdf?src-supplier=Digikey, ComponentLink9URL=https://datasheet.ciiva.com/1780/tca6424a-1780439.pdf?src-supplier=Digikey, ComponentLink10Description=https://datasheet.ciiva.com/14195/tca6424a-14195387.pdf?src-supplier=Avnet, ComponentLink10URL=https://datasheet.ciiva.com/14195/tca6424a-14195387.pdf?src-supplier=Avnet, ComponentLink11Description=https://datasheet.ciiva.com/41460/001187873-da-01-en-ic-i-o-expander-tca6424argjr-uqfn-32-tid-41460550.pdf?src-supplier=Conrad, ComponentLink11URL=https://datasheet.ciiva.com/41460/001187873-da-01-en-ic-i-o-expander-tca6424argjr-uqfn-32-tid-41460550.pdf?src-supplier=Conrad, Frequency=400kHz, Height=0.6mm, Item Type=IC, Lead Free="Lead Free", Length=5.15mm, Manufacturer Part Number=TCA6424ARGJR, Number of I/Os=24, Number of Outputs=24, Output Type=PUSH-PULL, Packaging="Tape and Reel", Pins=32, Pricing="1=2.13, 10=1.81, 50=1.81, 100=1.54, 1000=1.05, 10000=0.894 (USD)", Radiation Hardening=No, Reach SVHC Compliant=No, RoHS=Yes, RoHS Compliant=Yes, Series=-, Stock=59506, Supplier=Mouser, Weight=0.002116oz, Width=5.15mm
U6: "IC XPNDR 400KHZ I2C SMBUS 16UQFN", Case/Package=QFN, Clock Frequency=400kHz, LCSC Part Number=C2649390, Manufacturer="Texas Instruments", Max Operating Temperature=85°C, Max Supply Voltage=5.5V, Min Operating Temperature=-40°C, Min Supply Voltage=1.65V, Package Quantity=3000, ComponentLink1Description=https://datasheet.ciiva.com/4826/scps192c-115421-4826631.pdf?src-supplier=Mouser, ComponentLink1URL=https://datasheet.ciiva.com/4826/scps192c-115421-4826631.pdf?src-supplier=Mouser, ComponentLink2Description=https://datasheet.ciiva.com/15134/getdatasheetpartid-186210-15134440.pdf?src-supplier=Verical, ComponentLink2URL=https://datasheet.ciiva.com/15134/getdatasheetpartid-186210-15134440.pdf?src-supplier=Verical, ComponentLink3Description=https://datasheet.ciiva.com/41460/001187859-da-01-en-ic-i-o-expander-tca6408arsvr-qfn-16-tid-41460599.pdf?src-supplier=Conrad, ComponentLink3URL=https://datasheet.ciiva.com/41460/001187859-da-01-en-ic-i-o-expander-tca6408arsvr-qfn-16-tid-41460599.pdf?src-supplier=Conrad, ComponentLink4Description=https://datasheet.ciiva.com/1780/tca6408a-1780880.pdf?src-supplier=Digikey, ComponentLink4URL=https://datasheet.ciiva.com/1780/tca6408a-1780880.pdf?src-supplier=Digikey, ComponentLink5Description=https://datasheet.ciiva.com/3149/tca6408a-3149514.pdf?src-supplier=Avnet, ComponentLink5URL=https://datasheet.ciiva.com/3149/tca6408a-3149514.pdf?src-supplier=Avnet, Frequency=400kHz, Height=550um, Item Type=IC, Lead Free="Lead Free", Length=2.6mm, Manufacturer Part Number=TCA6408ARSVR, Number of I/Os=8, Number of Outputs=8, Output Type=PUSH-PULL, Packaging="Tape and Reel", Pins=16, Pricing="1=0.65, 10=0.463, 50=0.414, 100=0.362, 1000=0.305, 10000=0.275 (USD)", Radiation Hardening=No, Reach SVHC Compliant=No, RoHS=Yes, RoHS Compliant=Yes, Series=-, Stock=4894, Supplier=Mouser, Thickness=500um, Width=1.8mm
X1: library part Q13MC14620001, "32.768kHz 7pF ±20ppm MC-146 Crystals ROHS", LCSC Part Number=C3013800, Manufacturer="Seiko Epson", Package=MC-146, ComponentLink1Description=LCSC, ComponentLink1URL=https://www.lcsc.com/product-detail/Crystals_Seiko-span-style-background-color-ff0-Epson-span-Q13MC14620001_C3013800.html, Item Type=Crystals, Manufacturer Part Number=Q13MC14620001
X2: library part XRCGB48M000F4M00R0, "CRYSTAL 48.0000MHZ 6PF SMD", LCSC Part Number=C1986590, Manufacturer=Murata, ComponentLink1Description=https://datasheet.ciiva.com/3852/part29-3852564.pdf?src-supplier=Arrow+Electronics, ComponentLink1URL=https://datasheet.ciiva.com/3852/part29-3852564.pdf?src-supplier=Arrow+Electronics, ComponentLink2Description=https://datasheet.ciiva.com/852/p79e-852304.pdf?src-supplier=Digikey, ComponentLink2URL=https://datasheet.ciiva.com/852/p79e-852304.pdf?src-supplier=Digikey, ComponentLink3Description=https://datasheet.ciiva.com/852/p79e-852305.pdf?src-supplier=Digikey, ComponentLink3URL=https://datasheet.ciiva.com/852/p79e-852305.pdf?src-supplier=Digikey, ComponentLink4Description=https://datasheet.ciiva.com/852/p79e-852306.pdf?src-supplier=Digikey, ComponentLink4URL=https://datasheet.ciiva.com/852/p79e-852306.pdf?src-supplier=Digikey, ComponentLink5Description=https://datasheet.ciiva.com/1369/l0445e-1369913.pdf?src-supplier=Farnell, ComponentLink5URL=https://datasheet.ciiva.com/1369/l0445e-1369913.pdf?src-supplier=Farnell, ComponentLink6Description=https://datasheet.ciiva.com/1361/p79e-1361575.pdf?src-supplier=Element14, ComponentLink6URL=https://datasheet.ciiva.com/1361/p79e-1361575.pdf?src-supplier=Element14, Item Type=Crystals, Manufacturer Part Number=XRCGB48M000F4M00R0, Pricing="1=0.3, 10=0.231, 50=0.231, 100=0.211, 1000=0.179, 10000=0.128 (USD)", RoHS=Yes, Stock=4711, Supplier=Mouser

## Via types
v1: diameter 23.62, hole 11.81, Top Layer to Bottom Layer, tented both sides, 350 vias

## Nets (pads, with @x,y where several pads share a name; then routed paths per layer and width w, separated by ;. In a path a pad name is that pad's centre, name@x,y a point inside that pad or via, vN(x,y) a via of type N, cw(c..) or ccw(c..) an arc to the next point about the centre after c; other vN are vias at no path point)
3V: C4.2 C19.2 C22.2 C23.2 C25.2 C26.2 C27.2 C38.1 C59.2 FB3.2 J1.1 J5.1 Q1.2 Q4.2 Q4.6 Q5.2 Q6.2 R1.1 R21.1 R22.1 R23.1 R24.1 R25.1 R31.2 R32.1 R33.1 R35.1 R36.1 R37.1 R38.1 R40.1 R41.1 R42.1 R43.1 R47.1 R48.1 R49.1 R50.1 R51.1 R52.1 R55.2 R56.2 U3.8 U3.17 U3.31 U3.44 U3.57 U3.82 U6.14 U6.15 | length 2737.3
  Top Layer w7: R48.1@79.87,652.69 v1@79.87,681.42 ; v1@497.25,621.66 R49.1@497.25,650.39 ; R47.1@680.36,650.39 v1@680.36,679.12 ; v1@1099.87,623.05 R50.1@1099.87,651.78 ; R42.1@1290.33,652.78 v1@1290.33,681.51 ; v1@1698.86,625.54 R51.1@1698.86,654.27 ; R41.1@1888.97,652.78 v1@1888.97,681.51 ; v1@2298.5,621.87 R52.1@2298.5,650.6 ; R40.1@2478.87,379.28 2480.37,380.78 v1(2525.9,380.78) ; v1(2818.41,1418.25) R25.1@2922.34,1418.25 ; R24.1@3001.08,1418.25 3001.08,1476.48 v1(3001.67,1477.07) ; U3.17@4017.22,534.6 4017.22,501.42 4034.54,484.1 C23.2@4034.54,466.05 C23.2@4034.54,453.55 ; R32.1@4181.15,432.55 R33.1@4219.48,432.55 ; v1(4885.81,450.78) R56.2@4885.81,476.56
  Top Layer w8: R22.1@2746.09,430.26 R23.1@2784.55,430.26 2798.31,430.26 v1(2813.33,445.28) ; R31.2@3246.68,1264.81 3246.68,1230.29 3293.66,1183.31 v1(3372.9,1183.31) ; C27.2@3563.9,957.83 U3.82@3633.37,957.83 3828.25,957.83 3867.9,997.48 v1(3867.9,1000.31) ; R36.1@3783.07,354.83 3783.07,412.61 3810.93,440.48 v1(3840.97,440.48) 3840.06,441.39 U3.8@3840.06,534.6 ; v1(4034.54,433.68) C23.2@4034.54,453.55 ; U3.57@4056.59,1144.84 C19.2@4056.59,1207.64 4057.7,1208.75 4088.94,1208.75 v1(4090.04,1209.85) ; U3.31@4243.6,701.92 C25.2@4329.36,701.92 4364,701.92 4367.99,705.91 v1(4389.65,705.91) ; U3.44@4243.6,957.83 4245.44,959.67 4320.96,959.67 C26.2@4324.38,963.08 ; v1(4327,960.45) C26.2@4327,965.71 ; R35.1@4793,374 v1(4821,374)
  Top Layer w12: Q4.6@4232.8,1166.09 v1@4267.87,1166.09 ; v1@4300.09,1203.5 Q4.2@4335.16,1203.5
  Top Layer w15: v1(4561.98,912.62) FB3.2@4590.69,912.62 ; R55.2@4667.41,561.64 v1(4667.41,574.14)
  Top Layer w20: 3348.83,396.78 3469.92,396.78 3508.4,358.31 v1(3508.4,253.78)
  Bottom Layer w7: v1(4898.87,1424.78) v1@4904.87,1424.78
  Bottom Layer w15: v1@2298.81,621.22 2449.09,621.22 2525.9,544.41 v1(2525.9,380.78)
  Bottom Layer w20: J5.1@4241.87,-224.22 v1(4241.87,-79.22)
  other v1: 4198.65,432.55 4749.55,457.06 497.57,621.66 2298.81,621.87 1100.18,623.05 1699.17,625.54 680.05,679.12 1888.66,679.01 79.56,681.42 1290.02,681.51 3352.89,892.87 3432.86,892.87 3380.08,1093.35 4267.87,1166.45 4300.09,1203.14 4865.87,1424.78
3V_SRAM: C2.1 C3.1 R9.1 R12.1 U2.37
A0: U2.25 U3.33 | length 1955.1
  Top Layer w11: U2.25@2725.49,536.92 2725.49,701.92 v1(2784.55,760.98) ; v1(4092.9,710.31) 4163.4,710.31 4194.39,741.29 U3.33@4243.6,741.29
  Layer 1 w9.9: v1(2784.55,760.98) 2809.89,735.64 3930.9,735.64 3950.75,735.64 cw(c3950.75,725.74) 3960.65,725.74 3960.65,704.72 ccw(c3968.1,704.72) 3975.55,704.72 3975.55,738.19 cw(c3983,738.19) 3990.45,738.19 3990.45,704.72 ccw(c3997.9,704.72) 4005.35,704.72 4005.35,738.19 cw(c4012.8,738.19) 4020.25,738.19 4020.25,712.76 ccw(c4027.7,712.76) 4035.15,712.76 4035.15,725.74 cw(c4045.05,725.74) 4045.05,735.64 4062.61,735.64 4067.56,735.64 v1(4092.9,710.31)
A1: U2.24 U3.34 | length 1955.1
  Top Layer w11: v1(2650.1,1180.51) 2725.49,1255.9 U2.24@2725.49,1304.63 ; v1(4161.25,762.65) 4162.92,760.98 U3.34@4243.6,760.98
  Layer 1 w9.9: v1(2650.1,1180.51) 2650.1,1125.1 3012.56,762.65 v1(4161.25,762.65)
A2: U2.23 U3.35 | length 1943.8
  Top Layer w11: v1(2678.48,1135.33) 2678.32,1135.48 2678.32,1176.73 2745.18,1243.59 U2.23@2745.18,1304.63 ; v1(3974.9,805.31) 4156.58,805.31 4181.22,780.66 U3.35@4243.6,780.66
  Layer 1 w9.9: v1(2678.48,1135.33) 3009.51,804.3 3850.22,804.3 3870.07,804.3 cw(c3870.07,794.4) 3879.97,794.4 3879.97,787.39 ccw(c3887.42,787.39) 3894.87,787.39 3894.87,794.4 cw(c3904.77,794.4) 3904.77,804.3 3946.2,804.3 3973.89,804.3 v1(3974.9,805.31)
A3: U2.22 U3.37 | length 1955.5
  Top Layer w11: v1(2711.71,1165.01) 2711.71,1184.67 2764.86,1237.81 U2.22@2764.86,1304.63 ; v1(4079.74,834.69) 4160.97,834.69 4175.62,820.03 U3.37@4243.6,820.03
  Layer 1 w9.9: v1(2711.71,1165.01) 2711.71,1134.19 3011.21,834.69 3974.9,834.69 3998.11,834.69 cw(c3998.11,824.79) 4008.01,824.79 4008.01,823.79 ccw(c4015.46,823.79) 4022.91,823.79 4022.91,837.24 cw(c4030.36,837.24) 4037.81,837.24 4037.81,806.33 ccw(c4045.26,806.33) 4052.71,806.33 4052.71,824.79 cw(c4062.61,824.79) 4062.61,834.69 4067.56,834.69 4078.77,834.69 v1@4079.74,835.66
A4: U2.21 U3.38 | length 1955.1
  Top Layer w11: v1(2745.18,1164.01) 2745.18,1189.58 2784.55,1228.95 U2.21@2784.55,1304.63 ; v1(4079.74,865.31) 4161.25,865.31 4186.84,839.72 U3.38@4243.6,839.72
  Layer 1 w9.9: v1(2745.18,1164.01) 2747.8,1161.38 2747.8,1131.95 3014.45,865.31 3058.46,865.31 3063.41,865.31 ccw(c3063.41,875.21) 3073.31,875.21 3073.31,887.46 cw(c3080.76,887.46) 3088.21,887.46 3088.21,859.04 ccw(c3095.66,859.04) 3103.11,859.04 3103.11,884.05 cw(c3110.56,884.05) 3118.01,884.05 3118.01,865.31 ccw(c3125.46,865.31) 3132.91,865.31 3132.91,875.21 cw(c3140.36,875.21) 3147.81,875.21 ccw(c3157.71,875.21) 3157.71,865.31 3175.61,865.31 v1(4079.74,865.31)
A5: U2.20 U3.55 | length 1955.1
  Top Layer w11: v1(2779.04,1161.59) 2779.04,1197.98 2804.23,1223.17 U2.20@2804.23,1304.63 ; U3.55@4095.96,1144.84 4095.96,1101.39 4141.24,1056.12 v1(4141.24,1036.57)
  Layer 1 w9.9: v1(2779.04,1161.59) 2779.04,1135.17 2989.33,924.87 4029.55,924.87 4043.55,938.87 4069.31,964.64 cw(c4076.31,957.64) 4083.31,964.64 4092.56,955.39 ccw(c4097.83,960.66) 4103.1,955.39 ccw(c4097.83,960.66) 4103.1,965.93 4087.12,981.9 cw(c4092.39,987.17) 4087.12,992.44 cw(c4092.39,987.17) 4097.65,992.44 4129.34,960.76 ccw(c4134.61,966.02) 4139.87,960.76 ccw(c4134.61,966.02) 4139.87,971.29 4114.92,996.25 cw(c4121.92,1003.25) 4114.92,1010.25 4139.49,1034.82 v1(4141.24,1036.57)
A6: U2.19 U3.56 | length 1955.1
  Top Layer w11: v1(2809.74,1161.59) 2809.74,1203.23 2823.92,1217.41 U2.19@2823.92,1304.63 ; U3.56@4076.28,1144.84 4076.28,1095.62 4107.35,1064.56 v1(4107.35,1036.57)
  Layer 1 w9.9: v1(2809.74,1161.59) 2809.74,1137.08 2993.61,953.21 3797.4,953.21 3873.52,953.21 ccw(c3873.52,963.11) 3883.42,963.11 cw(c3890.87,963.11) 3898.32,963.11 3898.32,953.21 ccw(c3905.77,953.21) 3913.22,953.21 3913.22,975.82 cw(c3920.67,975.82) 3928.12,975.82 3928.12,950.66 ccw(c3935.57,950.66) 3943.02,950.66 3943.02,984.71 cw(c3950.47,984.71) 3957.92,984.71 3957.92,950.66 ccw(c3965.37,950.66) 3972.82,950.66 3972.82,984.71 cw(c3980.27,984.71) 3987.72,984.71 3987.72,963.11 ccw(c3997.62,963.11) 3997.62,953.21 4017.47,953.21 4023.99,953.21 v1(4107.35,1036.57)